# Altium PCB Keyboard_V0.1.PcbDoc (part 4 of 4)
Units mil, origin at the board's own origin, x right, y up, seen from the top; angles counter-clockwise.
Board outline 5480.32 x 4193.11 mil, 2 copper layers (Top Layer, Bottom Layer); 162 components, 142 nets, 755 pads, 487 vias.
Unrouted connection lines stored in the file: 1.
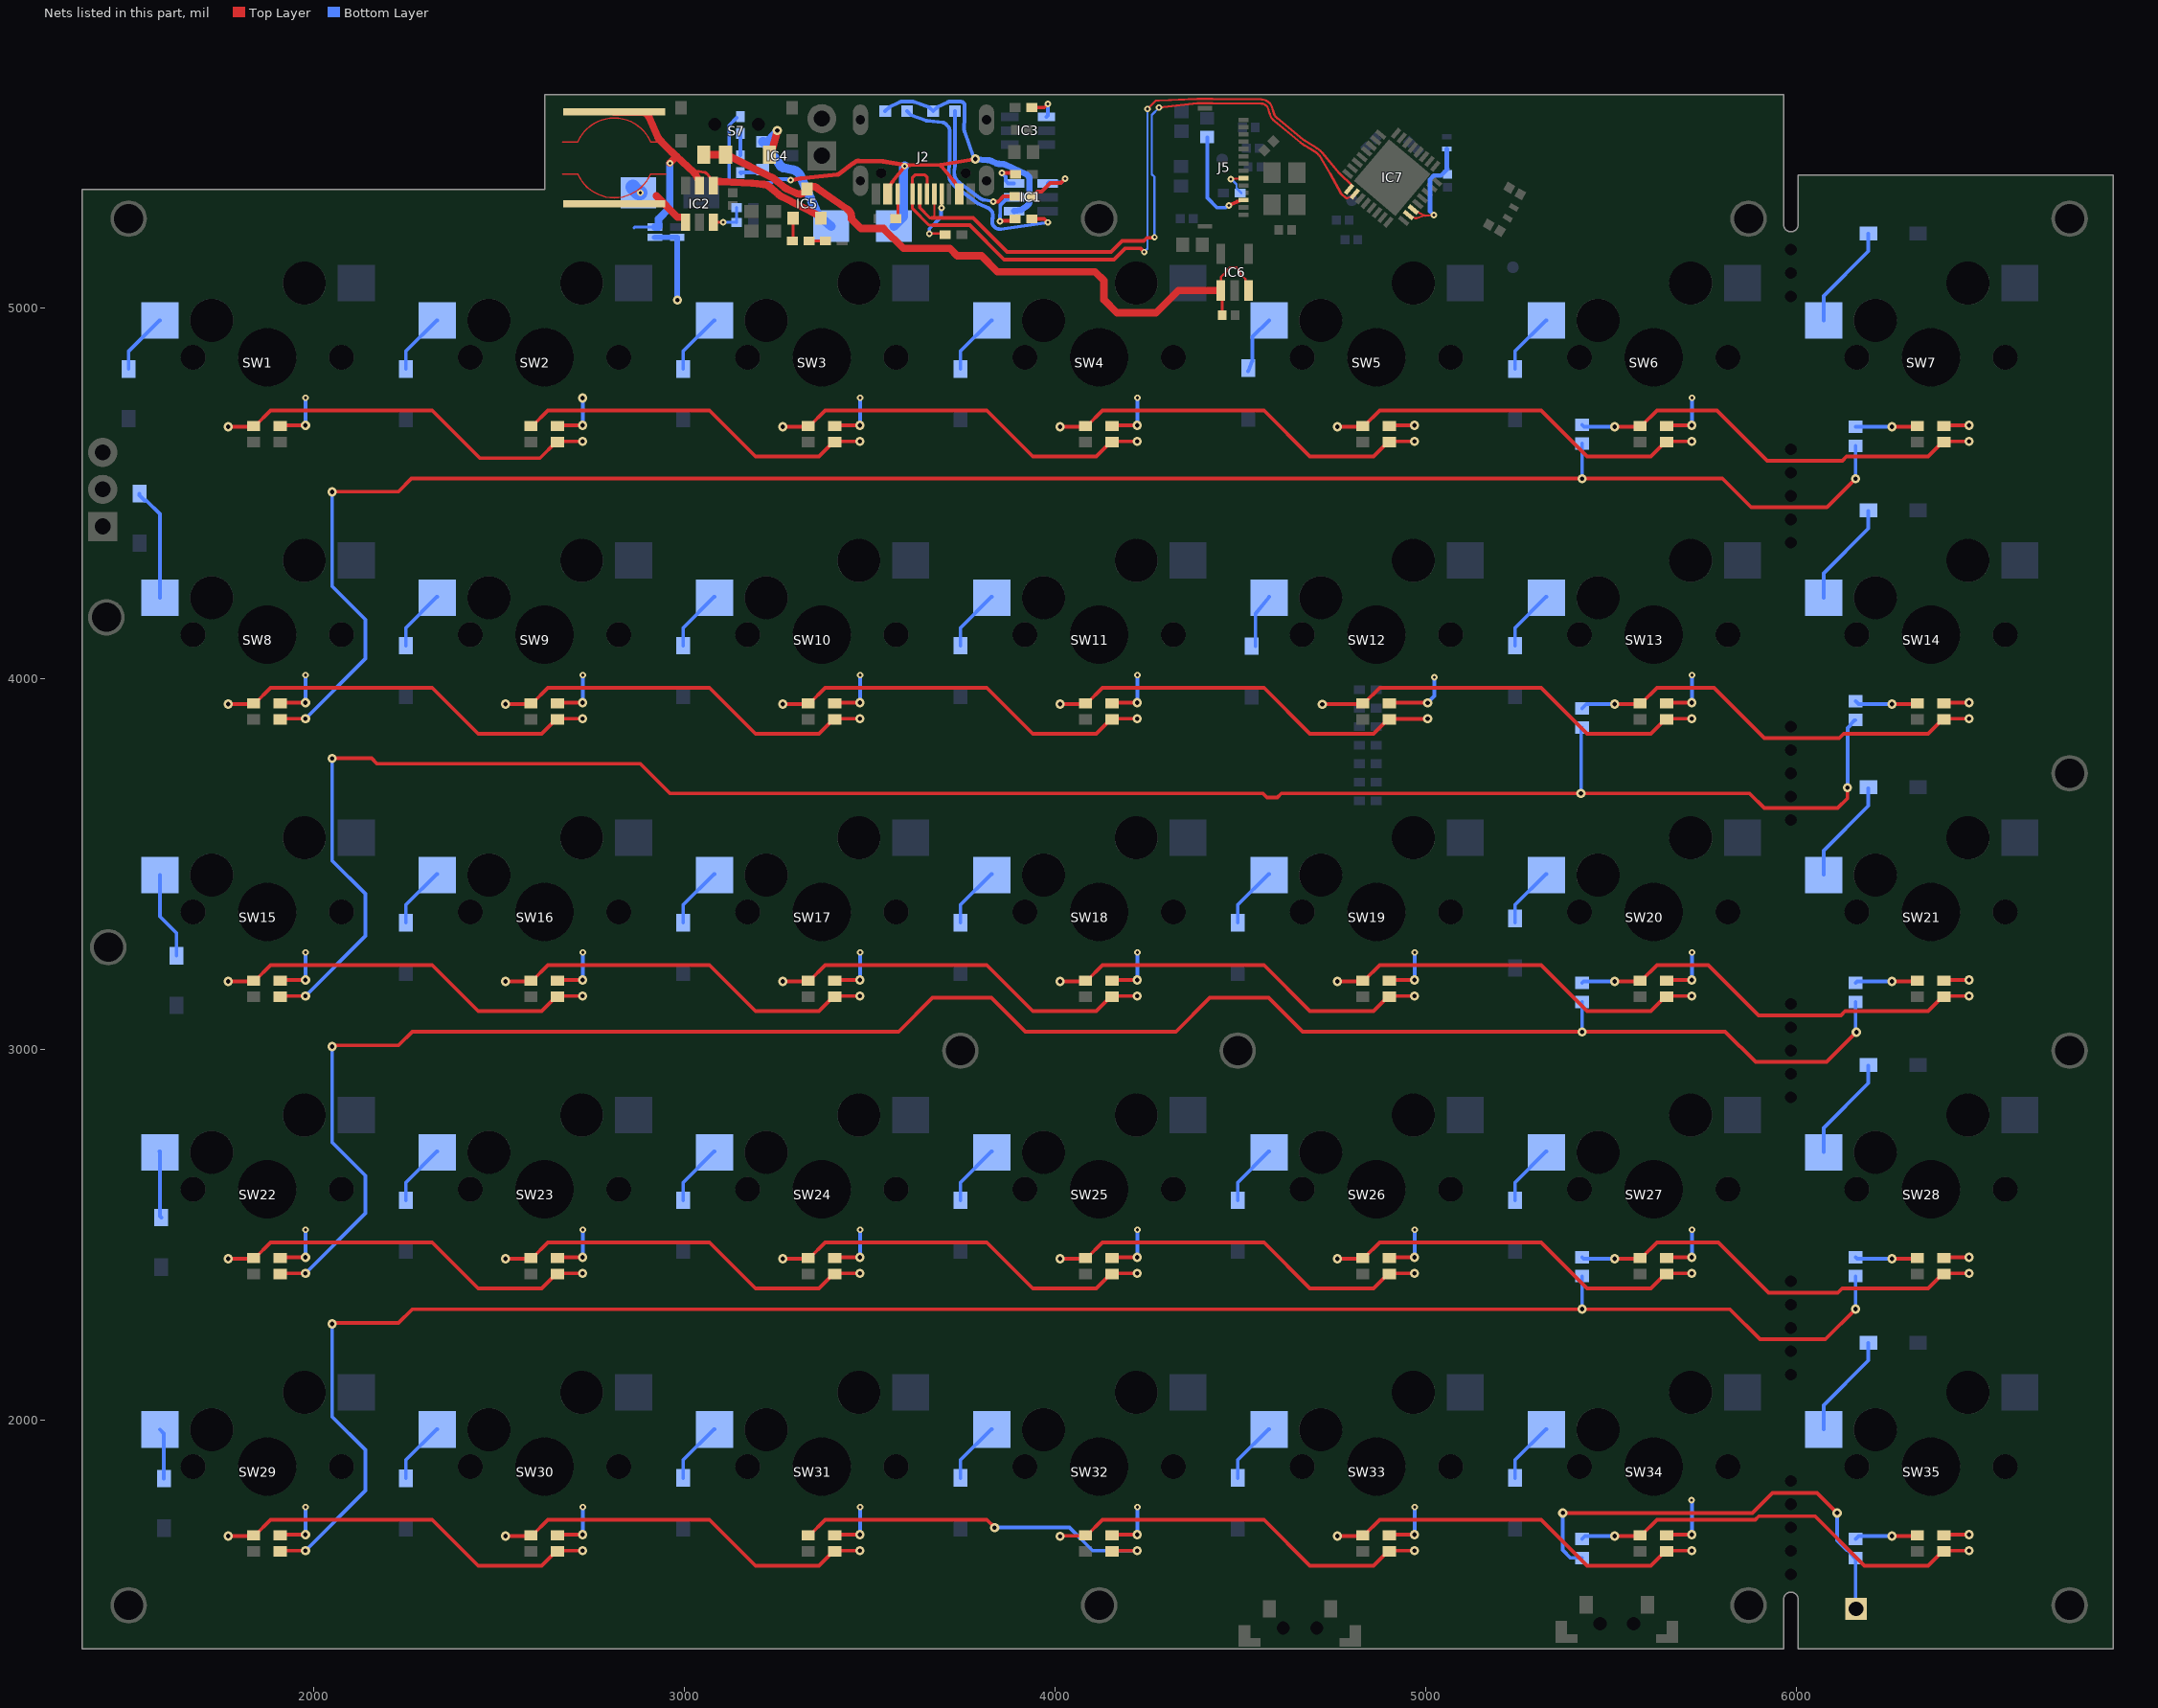
[diagram p3: the nets of this part, all layers, seen from the top]

## Via types
v1: diameter 25, hole 12, Top Layer to Bottom Layer, tented both sides, 244 vias
v2: diameter 17.72, hole 7.87, Top Layer to Bottom Layer, tented both sides, 242 vias
v3: diameter 17.72, hole 7.87, Top Layer to Bottom Layer, 1 vias

## Nets (pads, with @x,y where several pads share a name; then routed paths per layer and width w, separated by ;. In a path a pad name is that pad's centre, name@x,y a point inside that pad or via, vN(x,y) a via of type N, cw(c..) or ccw(c..) an arc to the next point about the centre after c; other vN are vias at no path point) (continued)
NetC21_2: C21.2 IC7.2 IC7.3 L3.2 | length 320.3
  Top Layer w6: IC7.2@4952.53,5249.79 4964.17,5243.82 4970.62,5241.68 ccw(c4973.45,5250.22) 4973.58,5241.22 4994.83,5248.96 ccw(c4997.36,5254.39) 4997.73,5248.41 v2(5021.26,5249.83) ; IC7.3@4965.19,5264.87 4976.82,5258.9 4994.46,5249.14 ccw(c4997.36,5254.39) 4994.79,5248.97
  Bottom Layer w12: v2(5021.26,5249.83) 5010.83,5260.26 5010.83,5346.46 5020.93,5356.56 5040.61,5356.56 5058.07,5374.02 5056.1,5375.98 L3.2@5056.1,5428.15
NetD1_2: D1.2 SW1.S1 | length 167
  Bottom Layer w10: D1.2@1500,4834.65 1500,4882.87 1583.27,4966.14 SW1.S1@1584.26,4966.14
NetD2_2: D2.2 SW2.S1 | length 167
  Bottom Layer w10: D2.2@2248.03,4834.65 2248.03,4882.87 2331.3,4966.14 SW2.S1@2332.29,4966.14
NetD3_2: D3.2 SW3.S1 | length 167
  Bottom Layer w10: D3.2@2996.06,4834.65 2996.06,4882.87 3079.34,4966.14 SW3.S1@3080.32,4966.14
NetD4_2: D4.2 SW4.S1 | length 167
  Bottom Layer w10: D4.2@3744.09,4834.65 3744.09,4882.87 3827.37,4966.14 SW4.S1@3828.35,4966.14
NetD5_2: D5.2 SW5.S1 | length 158.5
  Bottom Layer w10: D5.2@4520,4828.95 4531.19,4855.55 4531.19,4921.93 SW5.S1@4576.38,4966.14
NetD6_2: D6.2 SW6.S1 | length 167
  Bottom Layer w10: D6.2@5240.16,4834.65 5240.16,4882.87 5323.43,4966.14 SW6.S1@5324.41,4966.14
NetD7_2: D7.2 SW7.S1 | length 283.6
  Bottom Layer w10: SW7.S1@6072.45,4966.14 6072.45,5031.45 6193.29,5152.29 D7.2@6193.29,5199.72
NetD8_2: D8.2 SW8.S1 | length 306.2
  Bottom Layer w10: D8.2@1529.08,4498.59 1529.08,4493.67 1542.79,4479.97 1547.71,4479.97 1584.26,4443.42 SW8.S1@1584.26,4218.11
NetD9_2: D9.2 SW9.S1 | length 167
  Bottom Layer w10: D9.2@2248.03,4088.31 2248.03,4136.53 2331.3,4219.8 SW9.S1@2332.29,4219.8
NetD10_2: D10.2 SW10.S1 | length 167
  Bottom Layer w10: D10.2@2996.06,4088.31 2996.06,4136.53 3079.34,4219.8 SW10.S1@3080.32,4219.8
NetD11_2: D11.2 SW11.S1 | length 167
  Bottom Layer w10: D11.2@3744.09,4088.31 3744.09,4136.53 3827.37,4219.8 SW11.S1@3828.35,4219.8
NetD12_2: D12.2 SW12.S1 | length 145.2
  Bottom Layer w10: D12.2@4540,4087.22 4540,4173.9 SW12.S1@4576.38,4219.8
NetD13_2: D13.2 SW13.S1 | length 167
  Bottom Layer w10: D13.2@5240.16,4088.31 5240.16,4136.53 5323.43,4219.8 SW13.S1@5324.41,4219.8
NetD14_2: D14.2 SW14.S1 | length 283.6
  Bottom Layer w10: SW14.S1@6072.45,4218.11 6072.45,4283.41 6193.29,4404.26 D14.2@6193.29,4451.68
NetD15_2: D15.2 SW15.S1 | length 236.7
  Bottom Layer w10: SW15.S1@1584.26,3470.08 1584.26,3357.74 1629,3313 D15.2@1629,3251.93
NetD16_2: D16.2 SW16.S1 | length 167
  Bottom Layer w10: D16.2@2248.03,3341.12 2248.03,3389.34 2331.3,3472.61 SW16.S1@2332.29,3472.61
NetD17_2: D17.2 SW17.S1 | length 167
  Bottom Layer w10: D17.2@2996.06,3341.12 2996.06,3389.34 3079.34,3472.61 SW17.S1@3080.32,3472.61
NetD18_2: D18.2 SW18.S1 | length 167
  Bottom Layer w10: D18.2@3744.09,3341.12 3744.09,3389.34 3827.37,3472.61 SW18.S1@3828.35,3472.61
NetD19_2: D19.2 SW19.S1 | length 167
  Bottom Layer w10: D19.2@4492.13,3341.12 4492.13,3389.34 4575.4,3472.61 SW19.S1@4576.38,3472.61
NetD20_2: D20.2 SW20.S1 | length 167
  Bottom Layer w10: D20.2@5240.16,3341.12 5240.16,3389.34 5323.43,3472.61 SW20.S1@5324.41,3472.61
NetD21_2: D21.2 SW21.S1 | length 283.6
  Bottom Layer w10: SW21.S1@6072.45,3470.08 6072.45,3535.38 6193.29,3656.23 D21.2@6193.29,3703.65
NetD22_2: D22.2 SW22.S1 | length 178.7
  Bottom Layer w10: SW22.S1@1583.27,2723.69 SW22.S1@1584.26,2723.69 ; SW22.S1@1584.26,2722.05 1584.26,2549.67 D22.2@1588,2545.93
NetD23_2: D23.2 SW23.S1 | length 167
  Bottom Layer w10: D23.2@2248.03,2592.2 2248.03,2640.42 2331.3,2723.69 SW23.S1@2332.29,2723.69
NetD24_2: D24.2 SW24.S1 | length 167
  Bottom Layer w10: D24.2@2996.06,2592.2 2996.06,2640.42 3079.34,2723.69 SW24.S1@3080.32,2723.69
NetD25_2: D25.2 SW25.S1 | length 167
  Bottom Layer w10: D25.2@3744.09,2592.2 3744.09,2640.42 3827.37,2723.69 SW25.S1@3828.35,2723.69
NetD26_2: D26.2 SW26.S1 | length 167
  Bottom Layer w10: D26.2@4492.13,2592.2 4492.13,2640.42 4575.4,2723.69 SW26.S1@4576.38,2723.69
NetD27_2: D27.2 SW27.S1 | length 167
  Bottom Layer w10: D27.2@5240.16,2592.2 5240.16,2640.42 5323.43,2723.69 SW27.S1@5324.41,2723.69
NetD28_2: D28.2 SW28.S1 | length 283.6
  Bottom Layer w10: SW28.S1@6072.45,2722.05 6072.45,2787.35 6193.29,2908.2 D28.2@6193.29,2955.62
NetD29_2: D29.2 SW29.S1 | length 136.5
  Bottom Layer w10: SW29.S1@1584.26,1974.01 1595,1963.27 D29.2@1595,1841.93
NetD30_2: D30.2 SW30.S1 | length 167
  Bottom Layer w10: D30.2@2248.03,1843.42 2248.03,1891.64 2331.3,1974.91 SW30.S1@2332.29,1974.91
NetD31_2: D31.2 SW31.S1 | length 167
  Bottom Layer w10: D31.2@2996.06,1843.42 2996.06,1891.64 3079.34,1974.91 SW31.S1@3080.32,1974.91
NetD32_2: D32.2 SW32.S1 | length 167
  Bottom Layer w10: D32.2@3744.09,1843.42 3744.09,1891.64 3827.37,1974.91 SW32.S1@3828.35,1974.91
NetD33_2: D33.2 SW33.S1 | length 167
  Bottom Layer w10: D33.2@4492.13,1843.42 4492.13,1891.64 4575.4,1974.91 SW33.S1@4576.38,1974.91
NetD34_2: D34.2 SW34.S1 | length 167
  Bottom Layer w10: D34.2@5240.16,1843.42 5240.16,1891.64 5323.43,1974.91 SW34.S1@5324.41,1974.91
NetD35_2: D35.2 SW35.S1 | length 283.6
  Bottom Layer w10: SW35.S1@6072.45,1974.01 6072.45,2039.32 6193.29,2160.17 D35.2@6193.29,2207.59
NetD36_1: D36.1 IC2.1 L1.2 | length 141.1
  Top Layer w20: 2923.59,5301.77 2980.95,5244.41 3000.79,5244.41 IC2.1@3002.6,5230.79
  Bottom Layer w40: D36.1@2860,5325.35 D36.1@2875.35,5310 v2(2880,5310)
NetD37_2: D37.2 R1.1 | length 649.8
  Top Layer w10: R1.1@3937.05,5240 3970,5240 v2(3980,5230)
  Bottom Layer w10: D37.2@3600,5530 3610.75,5519.25 3651.38,5504.83 ccw(c3654.72,5514.25) 3653.67,5504.31 3695.24,5499.92 cw(c3693.67,5485) 3704.28,5495.61 3710.13,5489.75 cw(c3699.53,5479.14) 3714.53,5479.14 3714.53,5390.92 cw(c3699.53,5390.92) 3714.45,5389.44 3712.3,5367.83 ccw(c3757.86,5363.3) 3730.21,5326.81 3785.98,5284.56 ccw(c3814.16,5321.76) 3795.79,5278.86 3818.24,5269.25 cw(c3810,5250) 3830.8,5247.65 3830.8,5241.33 3830,5240.52 3830,5227.15 ccw(c3850.19,5232.7) 3853.13,5211.97 v2(3980,5230)
NetD38_2: D38.2 R5.1 | length 369.7
  Top Layer w10: v2(3832.79,5286.58) 3833.38,5285.98 3845.98,5285.98 3860,5300 R5.1@3891.77,5300
  Bottom Layer w10: D38.2@3729.53,5530 3729.53,5384.71 cw(c3714.53,5384.71) 3729.4,5382.73 3727.35,5367.37 ccw(c3757.86,5363.3) 3739.27,5338.77 3795.03,5296.52 ccw(c3814.16,5321.76) 3808.98,5290.52 v2(3832.79,5286.58)
NetIC1_1: IC1.1 R5.2 | length 159.4
  Top Layer w10: R5.2@3940,5300 3940,5301.59 3951.73,5313.32 3963.32,5313.32 3986.65,5336.65 4014.81,5336.65 v2(4026.28,5348.13)
  Bottom Layer w10: IC1.1@3979.28,5335.4 3981.69,5337.82 4015.98,5337.82 v2(4026.28,5348.13)
NetIC1_5: IC1.5 R1.2 | length 129.7
  Top Layer w10: v2(3850.94,5232.81) 3852.41,5234.29 3882.42,5234.29 3882.76,5233.94 R1.2@3888.82,5240
  Bottom Layer w10: v2(3850.94,5232.81) 3850.19,5232.83 3851.17,5272.65 cw(c3861.17,5272.41) 3854.2,5279.59 3866.17,5291.19 IC1.5@3888.72,5298
NetIC1_6: IC1.6 R6.1 | length 77.2
  Top Layer w10: v2(3856.04,5363.25) 3878.27,5363.25 R6.1@3881.31,5366.29
  Bottom Layer w10: v2@3856.09,5363.25 3865.81,5353.54 3865.81,5348.07 3866.17,5347.71 3866.17,5342.21 3872.98,5335.4 IC1.6@3888.72,5335.4
NetIC2_3: IC2.3 R4.1 R20.2 | length 102.9
  Top Layer w8: IC2.3@3077.4,5230.79 v2(3104.24,5230.79)
  Bottom Layer w8: v2(3104.24,5230.79) 3139.21,5230.79 R20.2@3140,5230 R4.1@3140,5270
NetIC3_4: IC3.4 R22.2 | length 81.1
  Top Layer w10: R22.2@3940,5540 3970,5540 v2(3980,5550)
  Bottom Layer w10: IC3.4@3975.87,5514.8 3980,5518.94 v2(3980,5550)
NetIC4_1: IC4.1 R7.1 | length 65.1
  Bottom Layer w10: R7.1@3152.13,5362.6 R7.1@3150,5364.72 3209.13,5364.72 IC4.1@3211.26,5362.6
NetIC5_1: IC5.1 R18.1 | length 62.3
  Top Layer w8: R18.1@3290,5180 3292.6,5182.6 IC5.1@3292.6,5241.26
NetJ2_A5: J2.A5 R23.1 | length 152
  Top Layer w6: v2(3660,5200) R23.1@3700,5200 ; v2(3692.79,5269.05) 3693.04,5269.3 3693.04,5307.62 J2.A5@3693.52,5308.1
  Bottom Layer w10: 3660,5210 3660,5213.17 3692.02,5245.19 3692.02,5268.28 v2(3692.79,5269.05)
NetJ2_B5: J2.B5 R24.1 | length 68.4
  Top Layer w8: R24.1@3569.7,5240.33 3575.18,5245.81 J2.B5@3575.18,5306.41
NetJ5_9: J5.9 R25.2 | length 85.2
  Top Layer w6: v2(4473.76,5346.68) 4475.12,5348.04 4506.51,5348.04 J5.9@4507.87,5349.41
  Bottom Layer w6: v2(4473.76,5346.68) 4474.92,5346.68 4488.81,5332.79 4488.81,5322.21 R25.2@4501.97,5309.06
NetJ5_12: J5.12 R26.2 | length 277.9
  Top Layer w10: v2(4467.75,5275.98) 4490.09,5285.74 cw(c4494.09,5276.57) 4490.29,5285.82 4499.09,5289.45 J5.12@4507.87,5290.35
  Bottom Layer w10: R26.2@4410,5460 4410,5296.02 4436.02,5270 4459.78,5270 4465.77,5275.98 v2(4467.75,5275.98)
NetR2_1: R2.1 R7.2 | length 60
  Bottom Layer w10: R7.2@3150,5410.92 R2.1@3150,5470.92
NetR3_1: R3.1 R18.2 | length 44.7
  Top Layer w8: R18.2@3335.28,5180 R3.1@3380,5180
NetR8_1: R8.1 SW6.1 SW7.3 | length 1142.6
  Top Layer w10: v1(5509.06,4678.9) 5575.16,4678.9 SW6.1@5577.09,4680.83 5581.02,4680.83 5623.09,4722.9 5784.98,4722.9 5920.51,4587.36 6122.8,4587.36 6134.33,4598.9 6354.6,4598.9 6393.23,4637.52 SW7.3@6397.17,4637.52 6399.1,4639.46 v1(6465.2,4639.46)
  Bottom Layer w10: R8.1@5420.9,4684.49 5426.49,4678.9 v1(5509.06,4678.9)
NetR8_2: R8.2 R9.2 SW8.3 | length 5157
  Top Layer w10: SW8.3@1908.98,3889.49 1910.91,3891.42 v1(1977.01,3891.42) ; v1@2049.01,4503.9 2227.9,4503.9 2262.9,4538.9 v1(5420.9,4538.9) 5799.69,4538.9 5877.2,4461.38 6081.38,4461.38 v1(6158.9,4538.9)
  Bottom Layer w10: v1(1977.01,3891.42) 2138.9,4053.31 2138.9,4158.9 2049.09,4248.71 2049.09,4349.2 2049.01,4349.28 v1(2049.01,4503) v1@2049.01,4503.42 ; v1(5420.9,4538.9) R8.2@5420.9,4633.31 ; v1(6158.9,4538.9) R9.2@6158.9,4627.72
NetR9_1: R9.1 SW7.1 | length 167
  Top Layer w10: v1(6257.09,4678.9) 6323.19,4678.9 SW7.1@6325.12,4680.83
  Bottom Layer w10: R9.1@6158.9,4678.9 v1(6257.09,4678.9)
NetR10_1: R10.1 SW13.1 SW14.3 | length 1150.7
  Top Layer w10: v1(5509.06,3930.87) SW13.1@5575.15,3930.87 ; v1(6465.2,3891.42) 6399.1,3891.42 SW14.3@6397.17,3889.49 6393.23,3889.49 6354.6,3850.87 6126.46,3850.87 6114.92,3839.33 5912.64,3839.33 5777.1,3974.87 5623.09,3974.87 5581.02,3932.8 SW13.1@5577.09,3932.8 ; SW13.1@5575.15,3930.87 SW13.1@5577.09,3932.8 ; SW13.1@5575.15,3930.87 SW13.1@5577.09,3932.8 ; SW13.1@5575.16,3930.87 SW13.1@5577.09,3932.8
  Bottom Layer w10: R10.1@5420.9,3918.9 5432.63,3930.63 5440.22,3930.63 5440.46,3930.87 v1(5509.06,3930.87)
NetR10_2: R10.2 R11.2 SW15.3 | length 5377.4
  Top Layer w10: SW15.3@1908.98,3141.46 1910.91,3143.39 v1(1977.01,3143.39) ; v1(2049.01,3784.6) 2155.4,3784.6 2170,3770 2880,3770 2960,3690 4560,3690 4570.94,3679.06 4598.67,3679.06 4609.63,3690.02 5872.97,3690.02 5912.64,3650.35 6110.35,3650.35 6136.63,3676.63 v1(6136.63,3705.69)
  Bottom Layer w10: v1(1977.01,3143.39) 2138.9,3305.28 2138.9,3418.9 2049.09,3508.71 2049.09,3601.17 2049.01,3601.25 v1(2049.01,3784.6) ; v1(5417.77,3690.02) 5418.6,3690.84 5418.6,3865.42 R10.2@5420.9,3867.72 ; v1@6137.04,3706.1 6137.04,3865.86 6145.2,3874.02 6145.2,3875.98 6156.93,3887.72 R11.2@6158.9,3887.72
NetR11_1: R11.1 SW14.1 | length 170.3
  Top Layer w10: v1(6257.09,3930.87) 6323.19,3930.87 SW14.1@6325.12,3932.8
  Bottom Layer w10: R11.1@6158.9,3938.9 6166.93,3930.87 v1(6257.09,3930.87)
NetR12_1: R12.1 SW20.1 SW21.3 | length 1144.6
  Top Layer w10: v1(5509.06,3182.84) 5575.16,3182.84 SW20.1@5577.09,3184.77 5581.02,3184.77 5623.09,3226.84 5761.35,3226.84 5896.89,3091.3 6118.86,3091.3 6130.39,3102.84 6354.6,3102.84 6393.23,3141.46 SW21.3@6397.17,3141.46 ; v1(6465.2,3143.39) SW21.3@6399.1,3143.39 ; SW21.3@6397.17,3141.46 SW21.3@6399.1,3143.39 ; SW21.3@6397.17,3141.46 SW21.3@6399.1,3143.39
  Bottom Layer w10: R12.1@5420.9,3178.9 5424.84,3182.84 v1(5509.06,3182.84)
NetR12_2: R12.2 R13.2 SW22.3 | length 5294.7
  Top Layer w10: SW22.3@1908.98,2393.43 1910.91,2395.36 v1(1977.01,2395.36) ; v1@2049.01,3010.37 2227.9,3010.37 2264.9,3047.37 3577.37,3047.37 3668.9,3138.9 3827.37,3138.9 3918.9,3047.37 4325.4,3047.37 4416.93,3138.9 4575.4,3138.9 4666.93,3047.37 5421.07,3047.37 5806.96,3047.37 5889.02,2965.31 6080.49,2965.31 v1(6160.87,3045.69)
  Bottom Layer w10: v1(1977.01,2395.36) 2138.9,2557.25 2138.9,2658.9 2049.09,2748.71 2049.09,2853.14 2049.01,2853.22 v1(2049.01,3006.94) ; R12.2@5420.9,3127.72 5420.9,3046.89 v1(5421.07,3046.72) ; R13.2@6158.9,3127.72 6158.9,3047.67 v1(6160.87,3045.69)
NetR13_1: R13.1 SW21.1 | length 168.7
  Top Layer w10: v1(6257.09,3182.84) 6323.19,3182.84 SW21.1@6325.12,3184.77
  Bottom Layer w10: R13.1@6158.9,3178.9 6162.84,3182.84 v1(6257.09,3182.84)
NetR14_1: R14.1 SW27.1 SW28.3 | length 1141.9
  Top Layer w10: v1(5509.06,2434.8) 5575.16,2434.8 SW27.1@5577.09,2436.74 5581.02,2436.74 5623.09,2478.8 5788.91,2478.8 5924.45,2343.27 6110.98,2343.27 6122.52,2354.8 6354.6,2354.8 6393.23,2393.43 SW28.3@6397.17,2393.43 6399.1,2395.36 v1(6465.2,2395.36)
  Bottom Layer w10: R14.1@5420.9,2438.9 5424.99,2434.8 v1(5509.06,2434.8)
NetR14_2: R14.2 R15.2 SW29.3 | length 5155
  Top Layer w10: SW29.3@1908.98,1645.4 1910.91,1647.33 v1(1977.01,1647.33) ; v1@2049.01,2261.45 2227.9,2261.45 2264.9,2298.45 5420.9,2298.45 5819.66,2298.45 5900.83,2217.28 6077.29,2217.28 v1(6158.9,2298.9)
  Bottom Layer w10: v1(1977.01,1647.33) 2138.9,1809.22 2138.9,1918.9 2049.09,2008.71 2049.09,2105.11 2049.01,2105.18 v1(2049.01,2258.91) ; v1(5420.9,2298.9) R14.2@5420.9,2387.72 ; v1(6158.9,2298.9) R15.2@6158.9,2387.72
NetR15_1: R15.1 SW28.1 | length 168.7
  Top Layer w10: v1(6257.09,2434.8) 6323.19,2434.8 SW28.1@6325.12,2436.74
  Bottom Layer w10: R15.1@6158.9,2438.9 6162.99,2434.8 v1(6257.09,2434.8)
NetR16_1: R16.1 SW34.1 SW35.3 | length 1144.6
  Top Layer w10: v1(5509.06,1686.77) SW34.1@5575.15,1686.77 ; v1(6465.2,1647.33) 6399.1,1647.33 SW35.3@6397.17,1645.4 6393.23,1645.4 6354.6,1606.77 6183.06,1606.77 6049.52,1740.31 5897.79,1740.31 5888.25,1730.77 5623.09,1730.77 5581.02,1688.7 SW34.1@5577.09,1688.7 ; SW34.1@5575.16,1686.77 SW34.1@5577.09,1688.7 ; SW34.1@5575.15,1686.77 SW34.1@5577.09,1688.7
  Bottom Layer w10: R16.1@5420.9,1678.9 5428.77,1686.77 v1(5509.06,1686.77)
NetR16_2: R16.2 R17.2 TP1.1 | length 1228.6
  Top Layer w10: v1(5368.9,1748.9) 5879.92,1748.9 5934.32,1803.3 6054.49,1803.3 v1(6108.9,1748.9)
  Bottom Layer w10: v1(5368.9,1748.9) 5368.9,1648.9 5390.08,1627.72 R16.2@5420.9,1627.72 ; v1(6108.9,1748.9) 6108.9,1675.08 6134.81,1649.17 6137.45,1649.17 6145.2,1641.42 6145.2,1639.45 6156.93,1627.72 R17.2@6158.9,1627.72 6158.9,1491.1 TP1.1@6160,1490
NetR17_1: R17.1 SW35.1 | length 170.3
  Top Layer w10: v1(6257.09,1686.77) 6323.19,1686.77 SW35.1@6325.12,1688.7
  Bottom Layer w10: R17.1@6158.9,1678.9 6166.77,1686.77 v1(6257.09,1686.77)
NetSW1_1: SW1.1 SW2.3 | length 1046.5
  Top Layer w10: v1(1768.9,4678.9) 1835,4678.9 SW1.1@1836.93,4680.83 1840.87,4680.83 1882.93,4722.9 2318.9,4722.9 2447.66,4594.13 2609.68,4594.13 2653.07,4637.52 SW2.3@2657.01,4637.52 2658.94,4639.46 v1(2725.04,4639.46)
NetSW2_1: SW2.1 SW3.3 | length 1045.3
  Top Layer w10: SW2.1@2583.03,4678.9 SW2.1@2584.96,4680.83 2588.9,4680.83 2630.97,4722.9 3066.93,4722.9 3190.93,4598.9 3362.48,4598.9 3401.1,4637.52 SW3.3@3405.04,4637.52 ; SW3.3@3405.04,4637.52 SW3.3@3406.97,4639.46 ; SW3.3@3405.04,4637.52 SW3.3@3406.97,4639.46 ; SW3.3@3406.97,4639.46 v1(3473.07,4639.46) SW3.3@3406.97,4639.46
NetSW3_1: SW3.1 SW4.3 | length 1180.2
  Top Layer w10: SW3.1@3331.06,4678.9 SW3.1@3332.99,4680.83 ; SW3.1@3331.06,4678.9 v1(3264.96,4678.9) SW3.1@3331.06,4678.9 ; SW3.1@3331.06,4678.9 SW3.1@3332.99,4680.83 ; SW3.1@3332.99,4680.83 3336.93,4680.83 3379,4722.9 3814.96,4722.9 3938.96,4598.9 4110.51,4598.9 4149.13,4637.52 SW4.3@4153.07,4637.52 ; SW4.3@4153.07,4637.52 SW4.3@4155,4639.46 ; SW4.3@4153.07,4637.52 SW4.3@4155,4639.46 ; SW4.3@4155,4639.46 v1(4221.1,4639.46) SW4.3@4155,4639.46
NetSW4_1: SW4.1 SW5.3 | length 1180.2
  Top Layer w10: SW4.1@4079.09,4678.9 SW4.1@4081.02,4680.83 ; SW4.1@4079.09,4678.9 v1(4012.99,4678.9) SW4.1@4079.09,4678.9 ; SW4.1@4079.09,4678.9 SW4.1@4081.02,4680.83 ; SW4.1@4081.02,4680.83 4084.96,4680.83 4127.03,4722.9 4562.99,4722.9 4686.99,4598.9 4858.54,4598.9 4897.16,4637.52 SW5.3@4901.1,4637.52 ; SW5.3@4901.1,4637.52 SW5.3@4903.03,4639.46 ; SW5.3@4901.1,4637.52 SW5.3@4903.03,4639.46 ; SW5.3@4903.03,4639.46 v1(4969.13,4639.46) SW5.3@4903.03,4639.46
NetSW5_1: SW5.1 SW6.3 | length 1180.2
  Top Layer w10: SW5.1@4827.12,4678.9 v1(4761.02,4678.9) SW5.1@4827.12,4678.9 ; SW5.1@4827.12,4678.9 SW5.1@4829.06,4680.83 ; SW5.1@4827.12,4678.9 SW5.1@4829.06,4680.83 ; SW5.1@4829.06,4680.83 4832.99,4680.83 4875.06,4722.9 5311.02,4722.9 5435.02,4598.9 5606.57,4598.9 5645.2,4637.52 SW6.3@5649.13,4637.52 ; SW6.3@5649.13,4637.52 SW6.3@5651.07,4639.46 ; SW6.3@5649.13,4637.52 SW6.3@5651.07,4639.46 ; SW6.3@5651.07,4639.46 v1(5717.16,4639.46) SW6.3@5651.07,4639.46
NetSW8_1: SW8.1 SW9.3 | length 1180.2
  Top Layer w10: SW8.1@1835,3930.87 v1(1768.9,3930.87) SW8.1@1835,3930.87 ; SW8.1@1835,3930.87 SW8.1@1836.93,3932.8 ; SW8.1@1835,3930.87 SW8.1@1836.93,3932.8 ; SW8.1@1836.93,3932.8 1840.87,3932.8 1882.93,3974.87 2318.9,3974.87 2442.9,3850.87 2614.44,3850.87 2653.07,3889.49 SW9.3@2657.01,3889.49 ; SW9.3@2657.01,3889.49 SW9.3@2658.94,3891.42 ; SW9.3@2657.01,3889.49 SW9.3@2658.94,3891.42 ; SW9.3@2658.94,3891.42 v1(2725.04,3891.42) SW9.3@2658.94,3891.42
NetSW9_1: SW9.1 SW10.3 | length 1317.9
  Top Layer w10: v1(2516.93,3930.87) SW9.1@2583.03,3930.87 ; v1(2516.93,3930.87) SW9.1@2583.03,3930.87 ; v1(2516.93,3930.87) SW9.1@2583.03,3930.87 ; SW9.1@2583.03,3930.87 SW9.1@2584.96,3932.8 ; SW9.1@2583.03,3930.87 SW9.1@2584.96,3932.8 ; SW9.1@2583.03,3930.87 SW9.1@2584.96,3932.8 ; SW9.1@2584.96,3932.8 2588.9,3932.8 2630.97,3974.87 3066.93,3974.87 3190.93,3850.87 3362.48,3850.87 3401.1,3889.49 SW10.3@3405.04,3889.49 ; SW10.3@3405.04,3889.49 SW10.3@3406.97,3891.42 ; SW10.3@3405.04,3889.49 SW10.3@3406.97,3891.42 ; SW10.3@3405.04,3889.49 SW10.3@3406.97,3891.42 ; SW10.3@3406.97,3891.42 v1(3473.07,3891.42) ; SW10.3@3406.97,3891.42 v1(3473.07,3891.42) ; SW10.3@3406.97,3891.42 v1(3473.07,3891.42)
NetSW10_1: SW10.1 SW11.3 | length 1317.9
  Top Layer w10: v1(3264.96,3930.87) SW10.1@3331.06,3930.87 ; v1(3264.96,3930.87) SW10.1@3331.06,3930.87 ; v1(3264.96,3930.87) SW10.1@3331.06,3930.87 ; SW10.1@3331.06,3930.87 SW10.1@3332.99,3932.8 ; SW10.1@3331.06,3930.87 SW10.1@3332.99,3932.8 ; SW10.1@3331.06,3930.87 SW10.1@3332.99,3932.8 ; SW10.1@3332.99,3932.8 3336.93,3932.8 3379,3974.87 3814.96,3974.87 3938.96,3850.87 4110.51,3850.87 4149.13,3889.49 SW11.3@4153.07,3889.49 ; SW11.3@4153.07,3889.49 SW11.3@4155,3891.42 ; SW11.3@4153.07,3889.49 SW11.3@4155,3891.42 ; SW11.3@4153.07,3889.49 SW11.3@4155,3891.42 ; SW11.3@4155,3891.42 v1(4221.1,3891.42) ; SW11.3@4155,3891.42 v1(4221.1,3891.42) ; SW11.3@4155,3891.42 v1(4221.1,3891.42)
NetSW11_1: SW11.1 SW12.3 | length 1215.2
  Top Layer w10: v1(5004.27,3891.15) 4902.76,3891.15 SW12.3@4901.1,3889.49 4897.16,3889.49 4858.54,3850.87 4686.99,3850.87 4562.99,3974.87 4127.03,3974.87 4084.96,3932.8 SW11.1@4081.02,3932.8 ; v1(4012.99,3930.87) SW11.1@4079.09,3930.87 ; v1(4012.99,3930.87) SW11.1@4079.09,3930.87 ; v1(4012.99,3930.87) SW11.1@4079.09,3930.87 ; SW11.1@4079.09,3930.87 SW11.1@4081.02,3932.8 ; SW11.1@4079.09,3930.87 SW11.1@4081.02,3932.8 ; SW11.1@4079.09,3930.87 SW11.1@4081.02,3932.8
NetSW12_1: SW12.1 SW13.3 | length 1224.3
  Top Layer w10: v1(4720,3930) 4720.87,3930.87 SW12.1@4827.12,3930.87 ; SW12.1@4827.12,3930.87 SW12.1@4829.06,3932.8 ; SW12.1@4827.12,3930.87 SW12.1@4829.06,3932.8 ; SW12.1@4829.06,3932.8 4832.99,3932.8 4875.06,3974.87 5311.02,3974.87 5435.02,3850.87 5606.57,3850.87 5645.2,3889.49 SW13.3@5649.13,3889.49 ; SW13.3@5649.13,3889.49 SW13.3@5651.07,3891.42 ; SW13.3@5649.13,3889.49 SW13.3@5651.07,3891.42 ; SW13.3@5649.13,3889.49 SW13.3@5651.07,3891.42 ; SW13.3@5651.07,3891.42 v1(5717.16,3891.42) ; SW13.3@5651.07,3891.42 v1(5717.16,3891.42) ; SW13.3@5651.07,3891.42 v1(5717.16,3891.42)
NetSW15_1: SW15.1 SW16.3 | length 1180.2
  Top Layer w10: SW15.1@1835,3182.84 SW15.1@1836.93,3184.77 ; SW15.1@1835,3182.84 v1(1768.9,3182.84) SW15.1@1835,3182.84 ; SW15.1@1835,3182.84 SW15.1@1836.93,3184.77 ; SW15.1@1836.93,3184.77 1840.87,3184.77 1882.93,3226.84 2318.9,3226.84 2442.9,3102.84 2614.44,3102.84 2653.07,3141.46 SW16.3@2657.01,3141.46 ; SW16.3@2657.01,3141.46 SW16.3@2658.94,3143.39 ; SW16.3@2657.01,3141.46 SW16.3@2658.94,3143.39 ; SW16.3@2658.94,3143.39 v1(2725.04,3143.39) SW16.3@2658.94,3143.39
NetSW16_1: SW16.1 SW17.3 | length 1317.9
  Top Layer w10: v1(2516.93,3182.84) SW16.1@2583.03,3182.84 ; v1(2516.93,3182.84) SW16.1@2583.03,3182.84 ; v1(2516.93,3182.84) SW16.1@2583.03,3182.84 ; SW16.1@2583.03,3182.84 SW16.1@2584.96,3184.77 ; SW16.1@2583.03,3182.84 SW16.1@2584.96,3184.77 ; SW16.1@2583.03,3182.84 SW16.1@2584.96,3184.77 ; SW16.1@2584.96,3184.77 2588.9,3184.77 2630.97,3226.84 3066.93,3226.84 3190.93,3102.84 3362.48,3102.84 3401.1,3141.46 SW17.3@3405.04,3141.46 ; SW17.3@3405.04,3141.46 SW17.3@3406.97,3143.39 ; SW17.3@3405.04,3141.46 SW17.3@3406.97,3143.39 ; SW17.3@3405.04,3141.46 SW17.3@3406.97,3143.39 ; SW17.3@3406.97,3143.39 v1(3473.07,3143.39) ; SW17.3@3406.97,3143.39 v1(3473.07,3143.39) ; SW17.3@3406.97,3143.39 v1(3473.07,3143.39)
NetSW17_1: SW17.1 SW18.3 | length 1317.9
  Top Layer w10: v1(3264.96,3182.84) SW17.1@3331.06,3182.84 ; v1(3264.96,3182.84) SW17.1@3331.06,3182.84 ; v1(3264.96,3182.84) SW17.1@3331.06,3182.84 ; SW17.1@3331.06,3182.84 SW17.1@3332.99,3184.77 ; SW17.1@3331.06,3182.84 SW17.1@3332.99,3184.77 ; SW17.1@3331.06,3182.84 SW17.1@3332.99,3184.77 ; SW17.1@3332.99,3184.77 3336.93,3184.77 3379,3226.84 3814.96,3226.84 3938.96,3102.84 4110.51,3102.84 4149.13,3141.46 SW18.3@4153.07,3141.46 ; SW18.3@4153.07,3141.46 SW18.3@4155,3143.39 ; SW18.3@4153.07,3141.46 SW18.3@4155,3143.39 ; SW18.3@4153.07,3141.46 SW18.3@4155,3143.39 ; SW18.3@4155,3143.39 v1(4221.1,3143.39) ; SW18.3@4155,3143.39 v1(4221.1,3143.39) ; SW18.3@4155,3143.39 v1(4221.1,3143.39)
NetSW18_1: SW18.1 SW19.3 | length 1317.9
  Top Layer w10: v1(4012.99,3182.84) SW18.1@4079.09,3182.84 ; v1(4012.99,3182.84) SW18.1@4079.09,3182.84 ; v1(4012.99,3182.84) SW18.1@4079.09,3182.84 ; SW18.1@4079.09,3182.84 SW18.1@4081.02,3184.77 ; SW18.1@4079.09,3182.84 SW18.1@4081.02,3184.77 ; SW18.1@4079.09,3182.84 SW18.1@4081.02,3184.77 ; SW18.1@4081.02,3184.77 4084.96,3184.77 4127.03,3226.84 4562.99,3226.84 4686.99,3102.84 4858.54,3102.84 4897.16,3141.46 SW19.3@4901.1,3141.46 ; SW19.3@4901.1,3141.46 SW19.3@4903.03,3143.39 ; SW19.3@4901.1,3141.46 SW19.3@4903.03,3143.39 ; SW19.3@4901.1,3141.46 SW19.3@4903.03,3143.39 ; SW19.3@4903.03,3143.39 v1(4969.13,3143.39) ; SW19.3@4903.03,3143.39 v1(4969.13,3143.39) ; SW19.3@4903.03,3143.39 v1(4969.13,3143.39)
NetSW19_1: SW19.1 SW20.3 | length 1317.9
  Top Layer w10: v1(4761.02,3182.84) SW19.1@4827.12,3182.84 ; v1(4761.02,3182.84) SW19.1@4827.12,3182.84 ; v1(4761.02,3182.84) SW19.1@4827.12,3182.84 ; SW19.1@4827.12,3182.84 SW19.1@4829.06,3184.77 ; SW19.1@4827.12,3182.84 SW19.1@4829.06,3184.77 ; SW19.1@4827.12,3182.84 SW19.1@4829.06,3184.77 ; SW19.1@4829.06,3184.77 4832.99,3184.77 4875.06,3226.84 5311.02,3226.84 5435.02,3102.84 5606.57,3102.84 5645.2,3141.46 SW20.3@5649.13,3141.46 ; SW20.3@5649.13,3141.46 SW20.3@5651.07,3143.39 ; SW20.3@5649.13,3141.46 SW20.3@5651.07,3143.39 ; SW20.3@5649.13,3141.46 SW20.3@5651.07,3143.39 ; SW20.3@5651.07,3143.39 v1(5717.16,3143.39) ; SW20.3@5651.07,3143.39 v1(5717.16,3143.39) ; SW20.3@5651.07,3143.39 v1(5717.16,3143.39)
NetSW22_1: SW22.1 SW23.3 | length 1180.2
  Top Layer w10: SW22.1@1835,2434.8 SW22.1@1836.93,2436.74 ; SW22.1@1835,2434.8 v1(1768.9,2434.8) SW22.1@1835,2434.8 ; SW22.1@1835,2434.8 SW22.1@1836.93,2436.74 ; SW22.1@1836.93,2436.74 1840.87,2436.74 1882.93,2478.8 2318.9,2478.8 2442.9,2354.8 2614.44,2354.8 2653.07,2393.43 SW23.3@2657.01,2393.43 ; SW23.3@2657.01,2393.43 SW23.3@2658.94,2395.36 ; SW23.3@2657.01,2393.43 SW23.3@2658.94,2395.36 ; SW23.3@2658.94,2395.36 v1(2725.04,2395.36) SW23.3@2658.94,2395.36
NetSW23_1: SW23.1 SW24.3 | length 1317.8
  Top Layer w10: v1(2516.93,2434.8) SW23.1@2583.03,2434.8 ; v1(2516.93,2434.8) SW23.1@2583.03,2434.8 ; v1(2516.93,2434.8) SW23.1@2583.03,2434.8 ; SW23.1@2583.03,2434.8 SW23.1@2584.96,2436.74 ; SW23.1@2583.03,2434.8 SW23.1@2584.96,2436.74 ; SW23.1@2583.03,2434.8 SW23.1@2584.96,2436.74 ; SW23.1@2584.96,2436.74 2588.9,2436.74 2630.97,2478.8 3066.93,2478.8 3190.93,2354.8 3362.48,2354.8 3401.1,2393.43 SW24.3@3405.04,2393.43 ; SW24.3@3405.04,2393.43 SW24.3@3406.97,2395.36 ; SW24.3@3405.04,2393.43 SW24.3@3406.97,2395.36 ; SW24.3@3405.04,2393.43 SW24.3@3406.97,2395.36 ; SW24.3@3406.97,2395.36 v1(3473.07,2395.36) ; SW24.3@3406.97,2395.36 v1(3473.07,2395.36) ; SW24.3@3406.97,2395.36 v1(3473.07,2395.36)
NetSW24_1: SW24.1 SW25.3 | length 1317.9
  Top Layer w10: v1(3264.96,2434.8) SW24.1@3331.06,2434.8 ; v1(3264.96,2434.8) SW24.1@3331.06,2434.8 ; v1(3264.96,2434.8) SW24.1@3331.06,2434.8 ; SW24.1@3331.06,2434.8 SW24.1@3332.99,2436.74 ; SW24.1@3331.06,2434.8 SW24.1@3332.99,2436.74 ; SW24.1@3331.06,2434.8 SW24.1@3332.99,2436.74 ; SW24.1@3332.99,2436.74 3336.93,2436.74 3379,2478.8 3814.96,2478.8 3938.96,2354.8 4110.51,2354.8 4149.13,2393.43 SW25.3@4153.07,2393.43 ; SW25.3@4153.07,2393.43 SW25.3@4155,2395.36 ; SW25.3@4153.07,2393.43 SW25.3@4155,2395.36 ; SW25.3@4153.07,2393.43 SW25.3@4155,2395.36 ; SW25.3@4155,2395.36 v1(4221.1,2395.36) ; SW25.3@4155,2395.36 v1(4221.1,2395.36) ; SW25.3@4155,2395.36 v1(4221.1,2395.36)
NetSW25_1: SW25.1 SW26.3 | length 1317.9
  Top Layer w10: v1(4012.99,2434.8) SW25.1@4079.09,2434.8 ; v1(4012.99,2434.8) SW25.1@4079.09,2434.8 ; v1(4012.99,2434.8) SW25.1@4079.09,2434.8 ; SW25.1@4079.09,2434.8 SW25.1@4081.02,2436.74 ; SW25.1@4079.09,2434.8 SW25.1@4081.02,2436.74 ; SW25.1@4079.09,2434.8 SW25.1@4081.02,2436.74 ; SW25.1@4081.02,2436.74 4084.96,2436.74 4127.03,2478.8 4562.99,2478.8 4686.99,2354.8 4858.54,2354.8 4897.16,2393.43 SW26.3@4901.1,2393.43 ; SW26.3@4901.1,2393.43 SW26.3@4903.03,2395.36 ; SW26.3@4901.1,2393.43 SW26.3@4903.03,2395.36 ; SW26.3@4901.1,2393.43 SW26.3@4903.03,2395.36 ; SW26.3@4903.03,2395.36 v1(4969.13,2395.36) ; SW26.3@4903.03,2395.36 v1(4969.13,2395.36) ; SW26.3@4903.03,2395.36 v1(4969.13,2395.36)
NetSW26_1: SW26.1 SW27.3 | length 1317.9
  Top Layer w10: v1(4761.02,2434.8) SW26.1@4827.12,2434.8 ; v1(4761.02,2434.8) SW26.1@4827.12,2434.8 ; v1(4761.02,2434.8) SW26.1@4827.12,2434.8 ; SW26.1@4827.12,2434.8 SW26.1@4829.06,2436.74 ; SW26.1@4827.12,2434.8 SW26.1@4829.06,2436.74 ; SW26.1@4827.12,2434.8 SW26.1@4829.06,2436.74 ; SW26.1@4829.06,2436.74 4832.99,2436.74 4875.06,2478.8 5311.02,2478.8 5435.02,2354.8 5606.57,2354.8 5645.2,2393.43 SW27.3@5649.13,2393.43 ; SW27.3@5649.13,2393.43 SW27.3@5651.07,2395.36 ; SW27.3@5649.13,2393.43 SW27.3@5651.07,2395.36 ; SW27.3@5649.13,2393.43 SW27.3@5651.07,2395.36 ; SW27.3@5651.07,2395.36 v1(5717.16,2395.36) ; SW27.3@5651.07,2395.36 v1(5717.16,2395.36) ; SW27.3@5651.07,2395.36 v1(5717.16,2395.36)
NetSW29_1: SW29.1 SW30.3 | length 1180.2
  Top Layer w10: SW29.1@1835,1686.77 SW29.1@1836.93,1688.7 ; SW29.1@1835,1686.77 v1(1768.9,1686.77) SW29.1@1835,1686.77 ; SW29.1@1835,1686.77 SW29.1@1836.93,1688.7 ; SW29.1@1836.93,1688.7 1840.87,1688.7 1882.93,1730.77 2318.9,1730.77 2442.9,1606.77 2614.44,1606.77 2653.07,1645.4 SW30.3@2657.01,1645.4 ; SW30.3@2657.01,1645.4 SW30.3@2658.94,1647.33 ; SW30.3@2657.01,1645.4 SW30.3@2658.94,1647.33 ; SW30.3@2658.94,1647.33 v1(2725.04,1647.33) SW30.3@2658.94,1647.33
NetSW30_1: SW30.1 SW31.3 | length 1317.8
  Top Layer w10: v1(2516.93,1686.77) SW30.1@2583.03,1686.77 ; v1(2516.93,1686.77) SW30.1@2583.03,1686.77 ; v1(2516.93,1686.77) SW30.1@2583.03,1686.77 ; SW30.1@2583.03,1686.77 SW30.1@2584.96,1688.7 ; SW30.1@2583.03,1686.77 SW30.1@2584.96,1688.7 ; SW30.1@2583.03,1686.77 SW30.1@2584.96,1688.7 ; SW30.1@2584.96,1688.7 2588.9,1688.7 2630.97,1730.77 3066.93,1730.77 3190.93,1606.77 3362.48,1606.77 3401.1,1645.4 SW31.3@3405.04,1645.4 ; SW31.3@3405.04,1645.4 SW31.3@3406.97,1647.33 ; SW31.3@3405.04,1645.4 SW31.3@3406.97,1647.33 ; SW31.3@3405.04,1645.4 SW31.3@3406.97,1647.33 ; SW31.3@3406.97,1647.33 v1(3473.07,1647.33) ; SW31.3@3406.97,1647.33 v1(3473.07,1647.33) ; SW31.3@3406.97,1647.33 v1(3473.07,1647.33)
NetSW31_1: SW31.1 SW32.3 | length 1012.9
  Top Layer w10: SW31.1@3332.99,1688.7 3336.93,1688.7 3379,1730.77 3814.96,1730.77 v1(3836.17,1709.56) ; SW32.3@4149.13,1645.4 SW32.3@4153.07,1645.4 4155,1647.33 v1(4221.1,1647.33)
  Bottom Layer w10: v1(3836.17,1709.56) 4038.24,1709.56 4100.47,1647.33 v1(4221.1,1647.33)
NetSW32_1: SW32.1 SW33.3 | length 1042.8
  Top Layer w10: v1(4012.99,1686.06) 4014.31,1687.38 4079.7,1687.38 SW32.1@4081.02,1688.7 4084.96,1688.7 4127.03,1730.77 4562.99,1730.77 4686.99,1606.77 4858.54,1606.77 4897.16,1645.4 SW33.3@4901.1,1645.4 4903.03,1647.33 v1(4969.13,1647.33)
NetSW33_1: SW33.1 SW34.3 | length 1317.9
  Top Layer w10: v1(4761.02,1686.77) SW33.1@4827.12,1686.77 ; v1(4761.02,1686.77) SW33.1@4827.12,1686.77 ; v1(4761.02,1686.77) SW33.1@4827.12,1686.77 ; SW33.1@4827.12,1686.77 SW33.1@4829.06,1688.7 ; SW33.1@4827.12,1686.77 SW33.1@4829.06,1688.7 ; SW33.1@4827.12,1686.77 SW33.1@4829.06,1688.7 ; SW33.1@4829.06,1688.7 4832.99,1688.7 4875.06,1730.77 5311.02,1730.77 5435.02,1606.77 5606.57,1606.77 5645.2,1645.4 SW34.3@5649.13,1645.4 ; SW34.3@5649.13,1645.4 SW34.3@5651.07,1647.33 ; SW34.3@5649.13,1645.4 SW34.3@5651.07,1647.33 ; SW34.3@5649.13,1645.4 SW34.3@5651.07,1647.33 ; SW34.3@5651.07,1647.33 v1(5717.16,1647.33) ; SW34.3@5651.07,1647.33 v1(5717.16,1647.33) ; SW34.3@5651.07,1647.33 v1(5717.16,1647.33)
USBD_N: IC7.26 J2.A7 J2.B7 | length 1821.6
  Top Layer w6: 3667.58,5241.89 3673.61,5247.92 J2.B7@3673.61,5306.41 ; v2(4280,5540) 4382.94,5551.85 cw(c4383.86,5543.9) 4383.86,5551.9 4423.23,5551.9 4556.14,5550.57 cw(c4555.95,5531.64) 4574.12,5536.97 4578.26,5522.87 ccw(c4616.58,5534.11) 4591.27,5503.23 4661.06,5445.68 ccw(c4718.36,5515) 4671.87,5438.01 4699.75,5421.16 cw(c4674.89,5380.1) 4716.35,5404.28 4740.77,5362.43 cw(c4699.32,5338.24) 4741.35,5361.42 4771.07,5307.5 ccw(c4778.07,5311.37) 4772.91,5305.27 4781.98,5297.65 ccw(c4787.12,5303.78) 4789.94,5296.29 4797.38,5299.09 IC7.26@4807.8,5306.99
  Top Layer w8: J2.A7@3634.16,5308.41 3634.16,5269.84 3662.11,5241.89 3667.58,5241.89
  Top Layer w10: 3667.58,5241.89 3778.11,5241.89 3870,5150 4150,5150 4180,5180 4238.19,5180 4246.72,5188.52 4265.88,5188.52 v2(4267.36,5190)
  Bottom Layer w6: v2(4267.36,5190) 4267.05,5190.31 4267.05,5353.06 4260,5360.11 4260,5520 v2(4280,5540)
USBD_P: IC7.25 J2.A6 J2.B6 | length 1933.5
  Top Layer w6: v2(4248.42,5536.17) 4271.11,5558.86 4278.3,5558.86 4278.36,5558.92 4279.28,5558.92 4383.13,5562.88 cw(c4383.86,5543.9) 4383.86,5562.9 4423.23,5562.9 cw(c4423.27,5551.9) 4423.37,5562.9 4556.25,5561.57 cw(c4555.95,5531.64) 4584.68,5540.06 4588.81,5526 ccw(c4616.58,5534.11) 4598.18,5511.78 4668.05,5454.17 ccw(c4718.36,5515) 4677.56,5447.42 4705.45,5430.57 cw(c4674.89,5380.1) 4720.19,5417.9 4767.08,5361.71 ccw(c4773.22,5366.84) 4767.65,5361.1 4798.69,5331.28 IC7.25@4792.72,5319.64
  Top Layer w8: J2.A6@3653.84,5308.41 3653.84,5352.64 3648.23,5358.26 3621.26,5358.26 3614.47,5351.47 3614.47,5267.53 3659.05,5222.95 3670,5222.95
  Top Layer w10: 3670,5222.95 3768.76,5222.95 3861.72,5130 4158.28,5130 4188.28,5160 4230.28,5160 4240,5150.28 v2(4240,5150)
  Bottom Layer w6: v2(4240,5150) 4240,5151.26 4248.42,5159.68 v2(4248.42,5536.17)
V_USB: D37.1 D38.1 D39.1 IC1.4 J2.A4B9 J2.B4A9 R2.2 | length 1886.8
  Top Layer w10: J2.B4A9@3547.54,5308.41 3554.43,5329.95 3560.77,5340.21 cw(c3569.28,5334.95) 3561.45,5341.17 ; 3561.45,5341.18 v2@3593.32,5381.23 ; v2(3593.63,5382.3) 3595.11,5383.78 3600.56,5383.78 3600.86,5384.07 3607.97,5384.07 3608.9,5385 3689.14,5385 3692.09,5382.05 cw(c3685,5375) 3692.62,5381.48 3726.52,5341.41 cw(c3718.88,5334.95) 3727.39,5340.21 3733.72,5329.95 J2.A4B9@3740.46,5308.41 ; 3690.81,5385.14 3691.96,5385.34 v1(3784.19,5400.95)
  Top Layer w12: v2(3286.16,5344.14) 3312.42,5348.56 cw(c3314.25,5337.72) 3313.13,5348.66 3410.6,5358.69 ccw(c3409.37,5370.63) 3416.54,5361.01 3454.47,5389.29 cw(c3474,5363.1) 3454.71,5389.47 3460.17,5393.46 cw(c3467.26,5383.78) 3466.9,5395.77 3466.97,5395.77 3469.41,5395.83 3530.69,5395.08 cw(c3530.3,5363.3) 3535.3,5394.68 v2@3593.97,5385.33
  Bottom Layer w10: R2.2@3140,5512.32 3120,5492.32 3120,5342.71 3125.86,5336.85 3233.12,5336.85 3242.64,5346.37 3275.81,5346.37 3276.57,5345.62 3284.68,5345.62 v2(3286.16,5344.14) ; D37.1@3540.94,5530 3551.69,5540.75 3579.8,5554.7 cw(c3584.25,5545.75) 3584.25,5555.75 3615.75,5555.75 cw(c3615.75,5545.75) 3619.09,5555.17 3659.72,5540.75 D38.1@3670.47,5530 3681.22,5540.75 3709.33,5554.7 cw(c3713.78,5545.75) 3713.78,5555.75 3745.28,5555.75 cw(c3745.28,5545.75) 3755.28,5545.75 3755.28,5514.25 cw(c3745.28,5514.25) 3755.27,5513.87 3754.05,5482.14 ccw(c3774.97,5481.34) 3755.26,5474.28 3779.27,5407.23 ccw(c3788.68,5410.6) 3781.64,5403.5 v1(3784.19,5400.95)
  Bottom Layer w17: v1(3784.19,5400.95) 3817.14,5398.15 cw(c3814.16,5363.1) 3828.98,5394.99 3839.21,5390.24 ccw(c3848.48,5410.19) 3847.25,5388.22 3857.42,5387.65 cw(c3856.04,5363.25) 3866.38,5385.4 3921.99,5359.45 cw(c3916.28,5347.21) 3929.78,5347.21 3929.78,5286.19 cw(c3916.28,5286.19) 3923.96,5275.08 3907.78,5263.91 IC1.4@3888.72,5260.6
  Bottom Layer w25: D39.1@3564.65,5220 3590,5245.35 3590,5378.67 v2(3593.63,5382.3)
VLED: J3.1 J4.1 SW1.4 SW2.4 SW3.4 SW4.4 SW5.4 SW6.4 SW7.4 SW8.4 SW9.4 SW10.4 SW11.4 SW12.4 SW13.4 SW14.4 SW15.4 SW16.4 SW17.4 SW18.4 SW19.4 SW20.4 SW21.4 SW22.4 SW23.4 SW24.4 SW25.4 SW26.4 SW27.4 SW28.4 SW29.4 SW30.4 SW31.4 SW32.4 SW33.4 SW34.4 SW35.4 | length 4847.5
  Top Layer w10: SW29.4@1908.98,1688.7 1910.91,1690.64 v1(1977.01,1690.64) ; SW22.4@1908.98,2436.74 1910.91,2438.67 v1(1977.01,2438.67) ; SW15.4@1908.98,3184.77 1910.91,3186.7 v1(1977.01,3186.7) ; SW8.4@1908.98,3932.8 1910.91,3934.73 v1(1977.01,3934.73) ; SW1.4@1908.98,4680.83 1910.91,4682.76 v1(1977.01,4682.76) ; SW30.4@2657.01,1688.7 2658.94,1690.64 v1(2725.04,1690.64) ; SW23.4@2657.01,2436.74 2658.94,2438.67 v1(2725.04,2438.67) ; SW16.4@2657.01,3184.77 2658.94,3186.7 v1(2725.04,3186.7) ; SW9.4@2657.01,3932.8 2658.94,3934.73 v1(2725.04,3934.73) ; SW2.4@2657.01,4680.83 2658.94,4682.76 v1(2725.04,4682.76) ; SW31.4@3405.04,1688.7 3406.97,1690.64 v1(3473.07,1690.64) ; SW24.4@3405.04,2436.74 3406.97,2438.67 v1(3473.07,2438.67) ; SW17.4@3405.04,3184.77 3406.97,3186.7 v1(3473.07,3186.7) ; SW10.4@3405.04,3932.8 3406.97,3934.73 v1(3473.07,3934.73) ; SW3.4@3405.04,4680.83 3406.97,4682.76 v1(3473.07,4682.76) ; SW32.4@4153.07,1688.7 4155,1690.64 v1(4221.1,1690.64) ; SW25.4@4153.07,2436.74 4155,2438.67 v1(4221.1,2438.67) ; SW18.4@4153.07,3184.77 4155,3186.7 v1(4221.1,3186.7) ; SW11.4@4153.07,3932.8 4155,3934.73 v1(4221.1,3934.73) ; SW4.4@4153.07,4680.83 4155,4682.76 v1(4221.1,4682.76) ; SW33.4@4901.1,1688.7 4903.03,1690.64 v1(4969.13,1690.64) ; SW26.4@4901.1,2436.74 4903.03,2438.67 v1(4969.13,2438.67) ; SW19.4@4901.1,3184.77 4903.03,3186.7 v1(4969.13,3186.7) ; SW12.4@4901.1,3932.8 4902.76,3934.46 v1(5004.27,3934.46) ; SW5.4@4901.1,4680.83 4903.03,4682.76 v1(4969.13,4682.76) ; SW34.4@5649.13,1688.7 5651.07,1690.64 v1(5717.16,1690.64) ; SW27.4@5649.13,2436.74 5651.07,2438.67 v1(5717.16,2438.67) ; SW20.4@5649.13,3184.77 5651.07,3186.7 v1(5717.16,3186.7) ; SW13.4@5649.13,3932.8 5651.07,3934.73 v1(5717.16,3934.73) ; SW6.4@5649.13,4680.83 5651.07,4682.76 v1(5717.16,4682.76) ; SW35.4@6397.17,1688.7 6399.1,1690.64 v1(6465.2,1690.64) ; SW28.4@6397.17,2436.74 6399.1,2438.67 v1(6465.2,2438.67) ; SW21.4@6397.17,3184.77 6399.1,3186.7 v1(6465.2,3186.7) ; SW14.4@6397.17,3932.8 6399.1,3934.73 v1(6465.2,3934.73) ; SW7.4@6397.17,4680.83 6399.1,4682.76 v1(6465.2,4682.76)
  Bottom Layer w10: v1(1977.01,1690.64) v2(1977.01,1764.88) ; v1(1977.01,2438.67) v2(1977.01,2512.91) ; v1(1977.01,3186.7) v2(1977.01,3260.94) ; v1(1977.01,3934.73) v2(1977.01,4008.98) ; v1(1977.01,4682.76) v2(1977.01,4757.01) ; v1(2725.04,1690.64) v2(2725.04,1764.88) ; v1(2725.04,2438.67) v2(2725.04,2512.91) ; v1(2725.04,3186.7) v2(2725.04,3260.94) ; v1(2725.04,3934.73) v2(2725.04,4008.98) ; v1(2725.04,4682.76) v1(2725.04,4756.43) ; v1(3473.07,1690.64) v2(3473.07,1764.88) ; v1(3473.07,2438.67) v2(3473.07,2512.91) ; v1(3473.07,3186.7) v2(3473.07,3260.94) ; v1(3473.07,3934.73) v2(3473.07,4008.98) ; v1(3473.07,4682.76) v2(3473.07,4757.01) ; v1(4221.1,1690.64) v2(4221.1,1764.88) ; v1(4221.1,2438.67) v2(4221.1,2512.91) ; v1(4221.1,3186.7) v2(4221.1,3260.94) ; v1(4221.1,3934.73) v2(4221.1,4008.98) ; v1(4221.1,4682.76) v2(4221.1,4757.01) ; v1(4969.13,1690.64) v2(4969.13,1764.88) ; v1(4969.13,2438.67) v2(4969.13,2512.91) ; v1(4969.13,3186.7) v2(4969.13,3260.94) ; v1(5004.27,3934.46) 5022.76,3952.95 v2(5022.76,4003.14) ; v2(5716.08,1783.49) 5717.16,1782.41 v1(5717.16,1690.64) ; v1(5717.16,2438.67) v2(5717.16,2512.91) ; v1(5717.16,3186.7) v2(5717.16,3260.94) ; v1(5717.16,3934.73) v2(5717.16,4008.98) ; v1(5717.16,4682.76) v2(5717.16,4757.01)
  Bottom Layer w15: J4.1@2919.47,5190 J4.1@2920,5190 J3.1@2979.47,5190 ; J3.1@2980,5190 2980,5020.6 v1(2980.24,5020.36)
VSYS: D39.2 IC4.2 S7.3 | length 420.6
  Top Layer w20: S7.3@3228.58,5413.03 3236.3,5427.64 v1(3250,5478.07)
  Bottom Layer w20: IC4.2@3218.98,5445.12 3227.17,5453.31 ccw(c3212.97,5467.4) 3227.68,5453.85 v1(3250,5478.07)
  Bottom Layer w25: IC4.2@3210.63,5447.4 3212.6,5447.4 3215.85,5444.15 3257.26,5384.29 ccw(c3271.65,5394.25) 3267.97,5377.14 3292.14,5371.94 cw(c3286.16,5344.14) 3312.1,5355.78 3359.63,5249.82 D39.2@3395.35,5220
VSYS_ENABLED: IC2.4 IC2.5 IC5.2 J4.2 L1.1 | length 1003.2
  Top Layer w8: 3025,5365 3028.15,5365 ccw(c3028.15,5373) 3030.2,5365.27 3036.22,5366.89 cw(c3038.27,5359.15) 3039.58,5367.04 3053.77,5364.67 cw(c3051.81,5352.83) 3061.5,5359.91 3069.59,5348.83 IC2.4@3073.81,5338.24
  Top Layer w20: L1.1@2810,5528.03 2883.85,5528.03 cw(c2883.79,5508.03) 2895.36,5524.34 cw(c2810,5404.02) 2897.29,5522.95 cw(c2885.46,5506.83) 2903.81,5514.78 2927.83,5459.33 ccw(c2946.17,5467.32) 2931.97,5453.23 2937.88,5447.32 2964.07,5421.14 ccw(c2974.65,5431.77) 2964.49,5420.74 2978.23,5408.08 ; v2(2960,5390) 2978.08,5408.08 2978.23,5408.08 ; 3024.36,5365.61 2978.23,5408.08 ; 3024.39,5365.58 cw(c3010.82,5350.9) 3024.88,5365.12 3025,5365 3025.06,5364.93 cw(c3010.82,5350.9) 3028.29,5360.62 3038.19,5342.83 IC2.5@3040,5329.21 ; IC2.4@3077.4,5329.21 3077.4,5338.58 3079.21,5340.39 3095.41,5340.39 cw(c3095.35,5320.39) 3096.4,5340.36 3181.36,5335.9 cw(c3180,5310) 3182.48,5335.82 3213.43,5332.84 cw(c3210.94,5307.02) 3227.73,5326.8 3253.31,5305.21 ccw(c3286.16,5344.14) 3263.13,5298.7 3361.65,5248.98 IC5.2@3367.4,5241.26
  Bottom Layer w8: 2863.73,5215.74 2865.55,5217.56 J4.2@2920,5217.56
  Bottom Layer w20: J4.2@2920,5217.56 2929.53,5217.56 2929.69,5217.72 2929.69,5239.69 2960,5270 v2(2960,5390)
VSYS_ON: C6.2 IC5.3 IC6.1 IC6.3 S7.1 S7.2 | length 1858.3
  Top Layer w6: IC6.1@4446.6,5046.79 4446.6,5083.38 4472.16,5108.94 4487.84,5108.94 4498.94,5097.84 4498.94,5091.06 4512.59,5077.41 4512.59,5055.6 IC6.3@4521.4,5046.79
  Top Layer w8: IC6.1@4444.79,5029.23 4450,5023.23 C6.2@4450,4980
  Top Layer w20: S7.1@3051.42,5413.03 S7.2@3110.47,5413.03 3118.19,5410.52 3233.78,5352.55 cw(c3210.94,5307.02) 3243.79,5345.95 3269.43,5324.32 ccw(c3286.16,5344.14) 3275.31,5320.58 3301.64,5308.46 ccw(c3310,5326.63) 3321.84,5310.51 3324.25,5312.28 IC5.3@3330,5320 ; IC5.3@3330,5326.91 3335.75,5326.91 3345.21,5326.91 cw(c3345.19,5306.91) 3356.61,5323.32 3439.33,5265.49 cw(c3425,5245) 3450,5245.45 3450.04,5243 3450.04,5239.26 3475.78,5213.52 3536.48,5213.52 3590,5160 3715.36,5160 3735.36,5140 3800.76,5140 3843.62,5097.14 4107.14,5097.14 4131.2,5073.07 4131.2,5021.2 4166.33,4986.07 4271.25,4986.07 4331.97,5046.79 4444.79,5046.79 IC6.1@4444.79,5029.23
pads on no net: IC2.6 IC3.2 IC3.5 IC6.4 J2. J2.A8 J2.B8 J5.6 J5.15 J5.16 S1.3 S1.4 S1.5 S1.6 S1.7 S1.8 S4.3 S4.4 S4.5 S4.6 S4.7 S4.8 S7.4 S7.5 S7.6 S7.7 S7.8 S7.9 SW1. SW2. SW3. SW4. SW5. SW6. SW7. SW8. SW9. SW10. SW11. SW12. SW13. SW14. SW15. SW16. SW17. SW18. SW19. SW20. SW21. SW22. SW23. SW24. SW25. SW26. SW27. SW28. SW29. SW30. SW31. SW32. SW33. SW34. SW35.
copper on no net: | length 5258.2
  Bottom Layer w10: v1(2198.9,2152.84) v1(2198.9,2522.84) ; v1(2198.9,3648.9) v1(2198.9,4018.9) ; v1(2198.9,4396.93) v1(2198.9,4766.93) ; v2(2794.21,5215.74) 2829.08,5215.74 ; v1(2946.93,2152.84) v1(2946.93,2522.84) ; v1(2946.93,3648.9) v1(2946.93,4018.9) ; v1(2946.93,4396.93) v1(2946.93,4766.93) ; v1(3694.96,2152.84) v1(3694.96,2522.84) ; v1(3694.96,3648.9) v1(3694.96,4018.9) ; v1(3694.96,4396.93) v1(3694.96,4766.93) ; v1(5191.02,2152.84) v1(5191.02,2522.84) ; v1(5191.02,3648.9) v1(5191.02,4018.9) ; v1(5937.98,3623.5) 5916.92,3644.55 5916.92,3996.76 v1(5939.06,4018.9) ; v1(5939.06,2152.84) v1(5939.06,2522.84) ; v1(5939.06,4396.93) v1(5939.06,4766.93)

## Polygon pours and split planes (outlines as drawn)
GND on Top Layer "NONET_L02_P-001" (solid, pour order 1): 5288.39,5372.6 5960,5372.6 5960,5163.39 5288.39,5163.39
VLED on Top Layer "NONET_L02_P-001" (solid, remove dead copper, pour order 12): 1374.02,5066.93 1374.02,1381.89 6850.39,1381.89 6850.39,5066.93
GND on Top Layer "NONET_L02_P-001" (solid, pour order 6): 4908.34,5143.7 4581.3,5143.7 4515.75,5209.25 4515.75,5436.02 4563.98,5484.25 4656.5,5484.25 4925.2,5215.55 4925.2,5182.09
GND on Top Layer "NONET_L02_P-001" (solid, pour order 0): 4907.48,5373.03 5295.28,5373.03 5295.28,5141.73 4907.48,5141.73
GND on Bottom Layer "NONET_L02_P-001" (solid, remove dead copper, pour order 9): 3370,5570 3370,5260 3580,5050 4480,5050 4543.25,5113.24 4543.25,5570
GND on Bottom Layer "NONET_L02_P-001" (solid, pour order 4): 4699.8,5050 5960,5050 5960,5372.05 4699.8,5372.05
GND on Bottom Layer "NONET_L02_P-001" (solid, remove dead copper, pour order 11): 1374.02,5066.93 1374.02,1381.89 6850.39,1381.89 6850.39,5066.93
GND on Bottom Layer "NONET_L02_P-001" (solid, pour order 5): 4672.09,5400.65 4587.21,5185 4486.06,5185 4490.88,5426 4654.83,5422.84
GND on Bottom Layer "NONET_L02_P-001" (solid, remove dead copper, pour order 10): 2660,5570 2660,5030 3533.03,5030 3591.52,5088.48 3470,5210 3470,5570
3V3 on Bottom Layer "NONET_L02_P-001" (solid, pour order 7): 4450.79,5309.06 4498.03,5356.3 4530,5356.3 4530,5580 4410,5580 4410,5296.02 4426.02,5280 4450,5280
GND on Bottom Layer "NONET_L02_P-001" (solid, pour order 2): 4820.87,5365.16 4889.76,5448.82 4899.61,5460.63 5010.83,5366.14

## Other copper
Top Layer:
  rectangle net NetC13_2: 5251.97,5352.36 5271.65,5545.28
  rectangle net GND: 5161.42,5352.36 5196.85,5564.96
  rectangle net NetC13_2: 5708.66,5389.76 5728.35,5564.96
  rectangle net NetC13_2: 5622.05,5545.28 5728.35,5564.96
  rectangle net NetC13_2: 5622.05,5440.94 5641.73,5564.96
  rectangle net NetC13_2: 5543.31,5440.94 5641.73,5460.63
  rectangle net NetC13_2: 5523.62,5440.94 5543.31,5545.28
  rectangle net NetC13_2: 5437.01,5545.28 5543.31,5564.96
  rectangle net NetC13_2: 5437.01,5440.94 5456.69,5545.28
  rectangle net NetC13_2: 5358.27,5440.94 5437.01,5460.63
  rectangle net NetC13_2: 5338.58,5440.94 5358.27,5545.28
  rectangle net NetC13_2: 5161.42,5545.28 5358.27,5564.96

## Silkscreen, mask and mechanical layers (free items; w line width, h text height)
Top Overlay:
  circle w5: c1500,1500 r66.93
  circle w5: c4118.19,1500 r66.93
  circle w5: c6736.22,1500 r66.93
  circle w5: c6736.22,2996.06 r66.93
  circle w5: c6736.22,3744.09 r66.93
  circle w5: c6736.22,5240.16 r66.93
  circle w5: c1500,5240.16 r66.93
  circle w5: c4118.03,5240.16 r66.93
  circle w5: c3743.9,2995.9 r66.93
  circle w5: c4491.9,2996.06 r66.93
  circle w5: c5870.08,5240.16 r66.93
  circle w5: c5870.08,1500 r66.93
  circle w5: c1445,3275 r66.93
  circle w5: c1440,4165 r66.93
  lines w15: 4970,5210 4990,5190
Bottom Overlay:
  circle w5: c3743.9,2995.9 r66.93
  circle w5: c1500,5240.16 r66.93
  circle w5: c1500,1500 r66.93
  circle w5: c4118.19,1500 r66.93
  circle w5: c4491.9,2996.06 r66.93
  circle w5: c4118.03,5240.16 r66.93
  circle w5: c5870.08,5240.16 r66.93
  circle w5: c5870.08,1500 r66.93
  circle w5: c6736.22,2996.06 r66.93
  circle w5: c6736.22,5240.16 r66.93
  circle w5: c6736.22,3744.09 r66.93
  circle w5: c6736.22,1500 r66.93
  circle w5: c1445,3275 r66.93
  circle w5: c1440,4165 r66.93
Board Shape:
  lines w0.98: 1374.02,5319.09 2622.24,5319.09 2622.24,5358.27 2622.24,5575 2655.71,5575 ; 5735,5575 5964.57,5575 5964.57,5358.27
  lines w1: 1374.01,5319.09 1374.02,1381.89 5964.57,1381.89 5964.57,1397.64 5964.57,1515.75 cw(c5984.25,1515.75) 6003.94,1515.75 6003.94,1397.64 6003.94,1381.89 6854.33,1381.89 6854.33,5358.27 6003.94,5358.27 ; 2655.71,5575 5735,5575 ; 5964.57,5358.27 5964.57,5224.41 ccw(c5984.25,5224.41) 6003.94,5224.41 6003.94,5358.27 ; 6003.94,5358.27 6003.94,5358.27 ; 5964.57,1901.57 ccw(c5984.25,1901.57) 6003.94,1901.57 6003.94,2007.87 6003.94,2055.12 ccw(c5984.25,2055.12) 5964.57,2055.12 5964.57,2007.87 5964.57,1901.57 ; 5964.57,2440.94 ccw(c5984.25,2440.94) 6003.94,2440.94 6003.94,2547.24 6003.94,2700.79 6003.94,2807.09 ccw(c5984.25,2807.09) 5964.57,2807.09 5964.57,2700.79 5964.57,2547.24 5964.57,2440.94 ; 5964.57,3188.98 ccw(c5984.25,3188.98) 6003.94,3188.98 6003.94,3295.28 6003.94,3444.88 6003.94,3551.18 ccw(c5984.25,3551.18) 5964.57,3551.18 5964.57,3444.88 5964.57,3295.28 5964.57,3188.98 ; 5964.57,3937.01 ccw(c5984.25,3937.01) 6003.94,3937.01 6003.94,4043.31 6003.94,4192.91 6003.94,4299.21 ccw(c5984.25,4299.21) 5964.57,4299.21 5964.57,4192.91 5964.57,4043.31 5964.57,3937.01 ; 5964.57,4684.14 ccw(c5984.25,4684.14) 6003.94,4684.14 6003.94,4790.44 6003.94,4837.68 6003.94,4964.22 ccw(c5984.25,4964.22) 5964.57,4964.22 5964.57,4837.68 5964.57,4790.44 5964.57,4684.14
Mechanical 4:
  drawing of 202 lines, arcs and shapes, not listed